# Altium PCB PCB_HDMI_To_FPC-v1.0.PcbDoc (part 2 of 3)
Units mil, origin at the board's own origin, x right, y up, seen from the top; angles counter-clockwise.
Board outline 2043 x 1400 mil, 2 copper layers (Top Layer, Bottom Layer), stack 61.811 mil thick; 121 components, 92 nets, 483 pads, 226 vias.
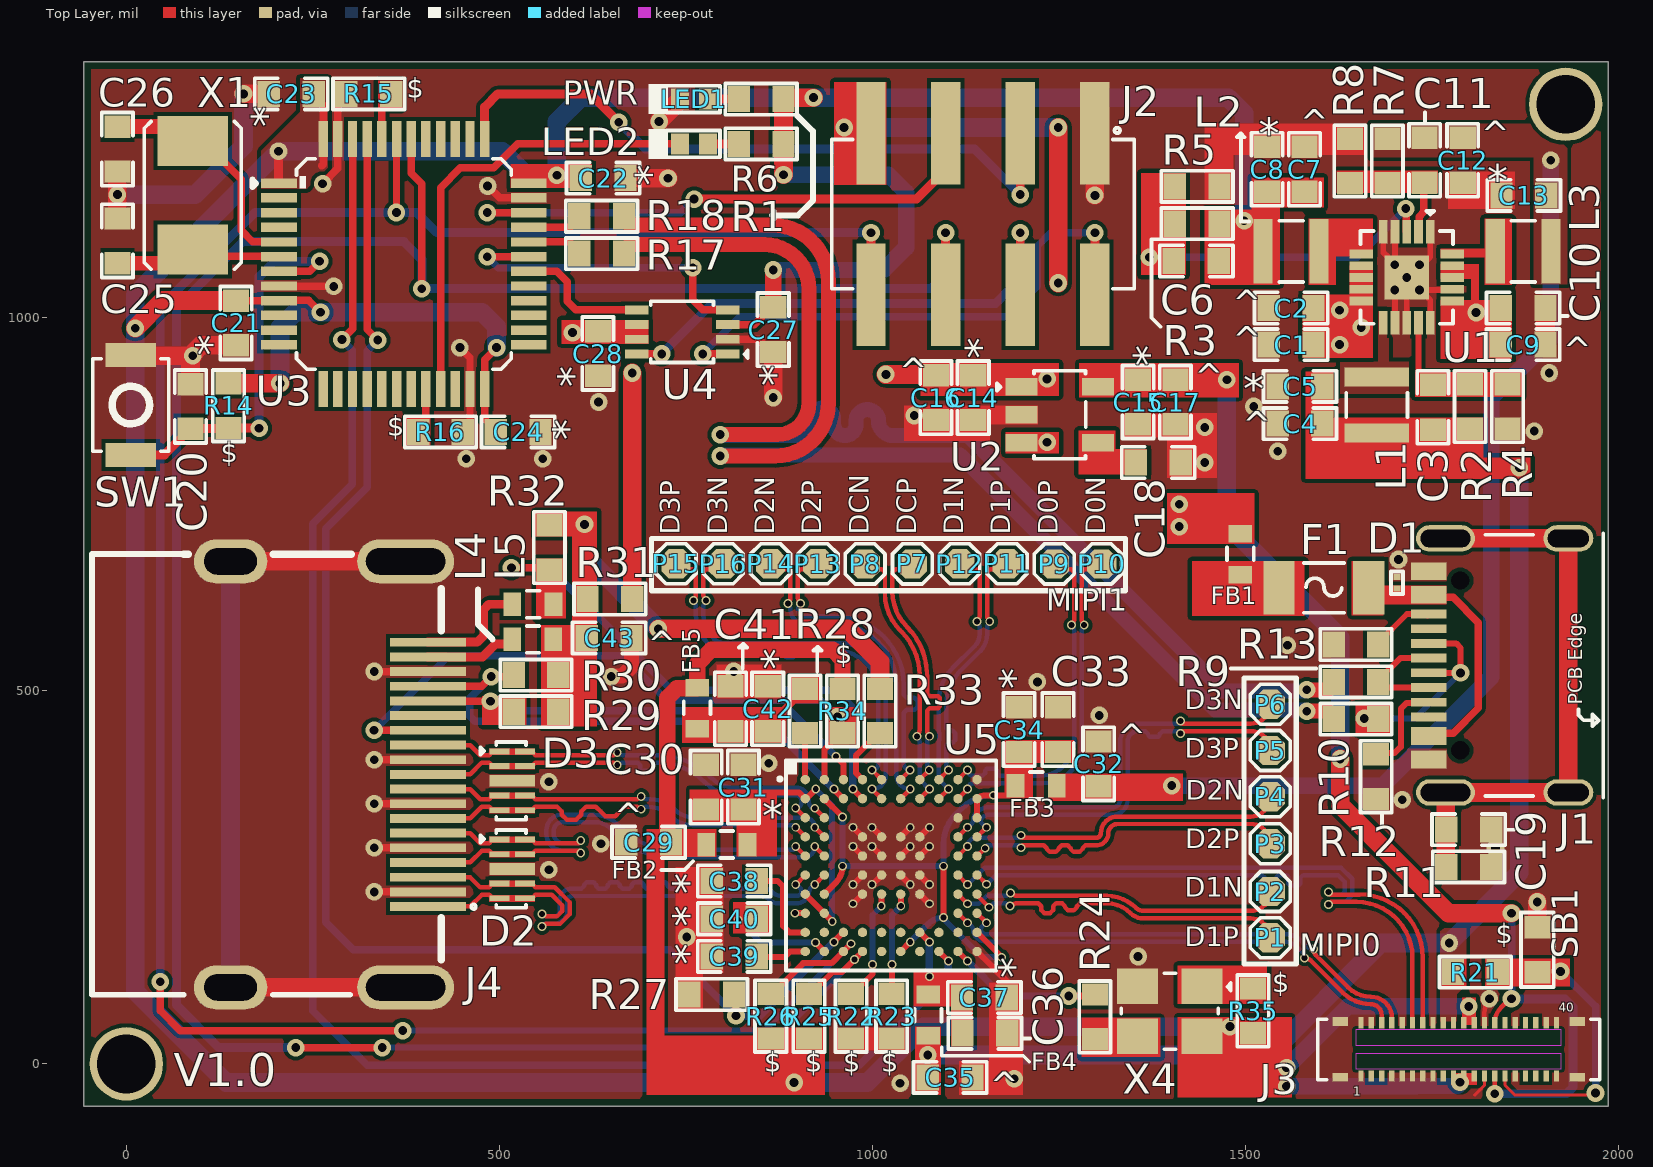
[diagram p0: Top Layer view]

## Part data (continued)
SW1: "SWITCH TACTILE SPST-NO 0.05A 12V", Contact Current Rating=50mA, Contact Resistance=100mR, Insulation Resistance=100MR, LCSC Part Number=C231329, Manufacturer=Omron, Max Operating Temperature=70°C, Max Voltage Rating (DC)=12V, Min Operating Temperature=-25°C, Operating Force=1.5N, Package Quantity=1, Ratings="Dust Proof,IP40", Supplier Part Number 1=SW1020DKR-ND, Actuator Length=0.4mm, Actuator Type=Standard, ComponentLink1Description=http://www.farnell.com/datasheets/60838.pdf?src-supplier=Farnell, ComponentLink1URL=http://www.farnell.com/datasheets/60838.pdf?src-supplier=Farnell, ComponentLink2Description=http://www.farnell.com/datasheets/60838.pdf?src-supplier=Element14, ComponentLink2URL=http://www.farnell.com/datasheets/60838.pdf?src-supplier=Element14, ComponentLink3Description=https://omronfs.omron.com/en_US/ecb/products/pdf/en-b3u.pdf?src-supplier=Digi-Key, ComponentLink3URL=https://omronfs.omron.com/en_US/ecb/products/pdf/en-b3u.pdf?src-supplier=Digi-Key, ComponentLink4Description=http://www.omron.com/ecb/products/pdf/en-b3u.pdf?src-supplier=Digi-Key, ComponentLink4URL=http://www.omron.com/ecb/products/pdf/en-b3u.pdf?src-supplier=Digi-Key, ComponentLink5Description=https://www.distrelec.biz/Web/Downloads/he/et/B3U_eng_datasheet.pdf?mime=application%2Fpdf&src-supplier=Distrelec, ComponentLink5URL=https://www.distrelec.biz/Web/Downloads/he/et/B3U_eng_datasheet.pdf?mime=application%2Fpdf&src-supplier=Distrelec, ComponentLink6Description=http://www.onlinecomponents.com/productFiles/mf-OM/en-b3u.pdf?src-supplier=Onlinecomponents.com, ComponentLink6URL=http://www.onlinecomponents.com/productFiles/mf-OM/en-b3u.pdf?src-supplier=Onlinecomponents.com, ComponentLink7Description=https://www.verical.com/server-webapp/html/getDatasheet?partID=552554&src-supplier=Verical, ComponentLink7URL=https://www.verical.com/server-webapp/html/getDatasheet?partID=552554&src-supplier=Verical, ComponentLink8Description=http://www.farnell.com/datasheets/1685550.pdf?src-supplier=Element14, ComponentLink8URL=http://www.farnell.com/datasheets/1685550.pdf?src-supplier=Element14, ComponentLink9Description=http://www.farnell.com/datasheets/2610940.pdf?src-supplier=Farnell, ComponentLink9URL=http://www.farnell.com/datasheets/2610940.pdf?src-supplier=Farnell, ComponentLink10Description=https://www.alliedelec.com/m/d/4c8a9ef82804fc3c241a13c1e298fd73.pdf?src-supplier=Allied+Electronics, ComponentLink10URL=https://www.alliedelec.com/m/d/4c8a9ef82804fc3c241a13c1e298fd73.pdf?src-supplier=Allied+Electronics, Contact Material=Silver, Current Rating=50mA, Depth=2.5mm, Electrical Life=200000Cycles, Height=1.2mm, Illumination Type=Non-Illuminated,Illuminated, Item Type=Switch, Lead Free="Lead Free", Length=4mm, Manufacturer Part Number=B3U-1000P, Max Current Rating=50mA, Mechanical Life=200000Cycles, Mount="Surface Mount", Orientation=Straight, Packaging="Tape and Reel", Pricing 1="1=1, 10=0.961, 25=0.9064, 50=0.7976, 100=0.7251, 250=0.68888, 500=0.67074, 1000=0.52571 (USD)", REACH SVHC=Unknown, Stock 1=116454, Supplier 1=Digi-Key, Switch Function=Off-Mom, Switch Travel=0.15mm, Termination=SMD/SMT, Throw Configuration=SPST, Voltage Rating (DC)=12V, Weight=0.000776oz, Width=3mm
U1: "2.7V~5.5V 3 WQFN-20-EP(3x3) Battery Management ICs ROHS", LCSC Part Number=C570857, Manufacturer="Everanalog IC Design", Package=WQFN-20-EP(3x3), ComponentLink1Description=LCSC, ComponentLink1URL=https://www.lcsc.com/product-detail/Battery-Management-ICs_Everanalog-IC-design-EA3036CQBR_C570857.html, Item Type=IC, Manufacturer Part Number=EA3036CQBR
U2: "IC REG LDO 2.8V 0.3A SOT23-5", Case/Package=SOT-23-5, Dropout Voltage=220mV, LCSC Part Number=C56731, Manufacturer=Richtek, Max Operating Temperature=125°C, Max Output current=300mA, Max Supply Voltage=5.5V, Min Current Limit=360mA, Min Input Voltage=2.5V, Min Operating Temperature=-40°C, Nominal Output Voltage=2.8V, Supplier Part Number=1028-1072-1-ND, Category="Voltage Regulators - Linear", ComponentLink1Description=https://datasheet.ciiva.com/22686/1720535-22686400.pdf?src-supplier=Element14, ComponentLink1URL=https://datasheet.ciiva.com/22686/1720535-22686400.pdf?src-supplier=Element14, ComponentLink2Description=https://datasheet.ciiva.com/24157/rt9193-28gb-24157638.pdf?src-supplier=Future+Electronics, ComponentLink2URL=https://datasheet.ciiva.com/24157/rt9193-28gb-24157638.pdf?src-supplier=Future+Electronics, Item Type=IC, Lead Free="Lead Free", Manufacturer Part Number=RT9193-28GB, Mounting Technology="Surface Mount", Number of Regulators=1, Output Current=300mA, Output Voltage=2.8V, Packaging="Cut Tape", Pins=5, Pricing="1=0.53, 10=0.454, 25=0.424, 100=0.3394, 250=0.31512, 500=0.26664, 1000=0.20604 (USD)", Reach SVHC Compliant=Unknown, RoHS=Yes, RoHS Compliant=Yes, Series=-, Stock=1346, Supplier=Digikey
U3: "IC MCU 32BIT 128KB FLASH 48LQFP", Case/Package=LQFP, Clock Frequency=72MHz, LCSC Part Number=C8304, Manufacturer=STMicroelectronics, Max Operating Temperature=85°C, Max Power Dissipation=363mW, Max Supply Voltage=3.6V, Min Operating Temperature=-40°C, Min Supply Voltage=2V, Package Quantity=250, Supplier Part Number=511-STM32F103CBT6, Address Bus Width=32b, Category=Microcontrollers, ComponentLink1Description=https://datasheet.ciiva.com/23669/1714663-23669200.pdf?src-supplier=Newark, ComponentLink1URL=https://datasheet.ciiva.com/23669/1714663-23669200.pdf?src-supplier=Newark, ComponentLink2Description=https://datasheet.ciiva.com/15122/getdatasheetpartid-92132-15122195.pdf?src-supplier=Verical, ComponentLink2URL=https://datasheet.ciiva.com/15122/getdatasheetpartid-92132-15122195.pdf?src-supplier=Verical, ComponentLink3Description=https://datasheet.ciiva.com/5752/cd00161566-5752838.pdf?src-supplier=Farnell, ComponentLink3URL=https://datasheet.ciiva.com/5752/cd00161566-5752838.pdf?src-supplier=Farnell, ComponentLink4Description=https://datasheet.ciiva.com/14100/pustm-arm-microcont-stm32f103-en-14100509.pdf?src-supplier=Distrelec, ComponentLink4URL=https://datasheet.ciiva.com/14100/pustm-arm-microcont-stm32f103-en-14100509.pdf?src-supplier=Distrelec, ComponentLink5Description=https://datasheet.ciiva.com/1502/cd00161566-1502328.pdf?src-supplier=Digi-Key, ComponentLink5URL=https://datasheet.ciiva.com/1502/cd00161566-1502328.pdf?src-supplier=Digi-Key, ComponentLink6Description=https://datasheet.ciiva.com/4840/cd00161566-4840398.pdf?src-supplier=Mouser, ComponentLink6URL=https://datasheet.ciiva.com/4840/cd00161566-4840398.pdf?src-supplier=Mouser, ComponentLink7Description=https://datasheet.ciiva.com/16219/cd00161566-16219150.pdf?src-supplier=Future+Electronics, ComponentLink7URL=https://datasheet.ciiva.com/16219/cd00161566-16219150.pdf?src-supplier=Future+Electronics, Core Architecture=ARM, Data Bus Width=32b, Density=128KB, Frequency=72MHz, Height=1.45mm, Interface=I2C,SPI,USB,CAN,IrDA,UART,USART,LIN, Item Type=IC, Lead Free="Lead Free", Length=7mm, Manufacturer Part Number=STM32F103CBT6, Memory Format=FLASH, Memory Size=128KB, Number of ADC Channels=10, Number of Bits=32, Number of I2C Channels=2, Number of I/Os=37, Number of Programmable I/O=37, Number of PWM Channels=12, Number of SPI Channels=2, Number of Timers/Counters=4, Oscillator Type=Internal, Packaging=Tray, Peripherals="POR,PWM,WDT,DMA,Temp Sensor,I2C", Pins=48, Pricing="1=7.35, 10=6.65, 50=5.53, 100=5.49, 1000=4.31, 10000=4.25 (USD)", Radiation Hardening=No, RAM Size=20KB, Reach SVHC Compliant=No, RoHS=Yes, RoHS Compliant=Yes, Series="STM32 F1", Stock=3552, Supplier=Mouser, Termination=SMD/SMT, Watchdog Timer=Yes, Width=7.2mm
U4: "IC TRANSLTR BIDIRECTIONAL 8VSSOP", Case/Package=VSSOP, High Level Output Current=-20uA, LCSC Part Number=C60709, Low Level Output Current=20uA, Manufacturer="Texas Instruments", Max Operating Temperature=85°C, Max Supply Voltage=5.5V, Min Operating Temperature=-40°C, Min Supply Voltage=1.2V, Nominal Supply Current=3.5uA, Package Quantity=3000, Supplier Part Number=296-22862-1-ND, Category="Voltage Level Shifters", Channel Type=Bidirectional, ComponentLink1Description=https://datasheet.ciiva.com/7744/1634161-7744195.pdf?src-supplier=Element14, ComponentLink1URL=https://datasheet.ciiva.com/7744/1634161-7744195.pdf?src-supplier=Element14, ComponentLink2Description=https://datasheet.ciiva.com/22677/1699360-22677930.pdf?src-supplier=Element14, ComponentLink2URL=https://datasheet.ciiva.com/22677/1699360-22677930.pdf?src-supplier=Element14, ComponentLink3Description=https://datasheet.ciiva.com/4226/sces641b-4226960.pdf?src-supplier=Arrow+Electronics, ComponentLink3URL=https://datasheet.ciiva.com/4226/sces641b-4226960.pdf?src-supplier=Arrow+Electronics, ComponentLink4Description=https://datasheet.ciiva.com/15096/getdatasheetpartid-214907-15096235.pdf?src-supplier=Verical, ComponentLink4URL=https://datasheet.ciiva.com/15096/getdatasheetpartid-214907-15096235.pdf?src-supplier=Verical, ComponentLink5Description=https://datasheet.ciiva.com/6132/txb0102-6132717.pdf?src-supplier=Farnell, ComponentLink5URL=https://datasheet.ciiva.com/6132/txb0102-6132717.pdf?src-supplier=Farnell, ComponentLink6Description=https://datasheet.ciiva.com/46384/1874809-46384198.pdf?src-supplier=Element14, ComponentLink6URL=https://datasheet.ciiva.com/46384/1874809-46384198.pdf?src-supplier=Element14, ComponentLink7Description=https://datasheet.ciiva.com/1899/txb0102-1899430.pdf?src-supplier=Digikey, ComponentLink7URL=https://datasheet.ciiva.com/1899/txb0102-1899430.pdf?src-supplier=Digikey, ComponentLink8Description=https://datasheet.ciiva.com/1899/txb0102-1899429.pdf?src-supplier=Digikey, ComponentLink8URL=https://datasheet.ciiva.com/1899/txb0102-1899429.pdf?src-supplier=Digikey, ComponentLink9Description=https://datasheet.ciiva.com/1899/txb0102-1899431.pdf?src-supplier=Digikey, ComponentLink9URL=https://datasheet.ciiva.com/1899/txb0102-1899431.pdf?src-supplier=Digikey, ComponentLink10Description=https://datasheet.ciiva.com/14287/txb0102-14287496.pdf?src-supplier=Avnet, ComponentLink10URL=https://datasheet.ciiva.com/14287/txb0102-14287496.pdf?src-supplier=Avnet, ComponentLink11Description=LCSC, ComponentLink11URL=https://www.lcsc.com/product-detail/Translators-Level-Shifters_Texas-Instruments-TXB0102DCUR_C60709.html, Data Rate=100Mbps, Height=900um, Lead Free="Lead Free", Length=2.3mm, Logic Function=Translator, Manufacturer Part Number=TXB0102DCUR, Mounting Technology="Surface Mount", Number of Bits=2, Number of Circuits=1, Number of Inputs=1NUMBER, Number of Outputs=1NUMBER, Output Type=3-STATE, Packaging="Tape and Reel", Pins=8, Pricing="1=0.69, 10=0.606, 25=0.5696, 100=0.4649, 250=0.4318, 500=0.36748, 1000=0.29398 (USD)", Propagation Delay=7.4ns, Radiation Hardening=No, Reach SVHC Compliant=No, RoHS=Yes, RoHS Compliant=Yes, Series=-, Stock=10593, Supplier=Digikey, Thickness=850um, Turn-On Delay Time=31ns, Type=IC, Weight=0.000339oz, Width=2mm
U5: "Ultra HD to Display Serial Interface Converter 80-Pin VFBGA", Case/Package=VFBGA, LCSC Part Number=C3008712, Manufacturer=Toshiba, Max Operating Temperature=70°C, Min Operating Temperature=-30°C, Supplier Part Number=757-TC358870XBG(NOK), ComponentLink1Description=LCSC, ComponentLink2Description=http://toshiba.semicon-storage.com/info/docget.jsp?did=28743&prodName=TC358870XBG&src-supplier=Avnet, ComponentLink2URL=http://toshiba.semicon-storage.com/info/docget.jsp?did=28743&prodName=TC358870XBG&src-supplier=Avnet, Item Type=IC, Manufacturer Part Number=TC358870XBG(NOK), Manufaure Part Number=TC358870XBG(NOK), Pricing="1=10.6, 10=9.75, 50=9.35, 100=8.24, 1000=7.32, 10000=6.71 (USD)", RoHS=Yes, Stock=662, Supplier=Mouser
X1: library part X50328MSB2GI, "8MHz 20pF ±10ppm ±50ppm SMD5032-2P Crystals ROHS", LCSC Part Number=C115962, Manufacturer="Yangxing Tech", Package=SMD5032-2P, ComponentLink1Description=LCSC, ComponentLink1URL=https://www.lcsc.com/product-detail/Crystals_Yangxing-Tech-X50328MSB2GI_C115962.html, Item Type=Crystal, Manufacturer Part Number=X50328MSB2GI
X4: library part O3240000153350, "3.3V 5mA ±25ppm 40MHz CMOS SMD3225-4P Oscillators ROHS", LCSC Part Number=C437132, Manufacturer=JGHC, ComponentLink1Description=LCSC, ComponentLink1URL=https://www.lcsc.com/product-detail/Oscillators_JGHC-O3240000153350_C437132.html, Item Type=Crystal, Manufacturer Part Number=O3240000153350

## Free pads (board coordinates)
  round 98.43 hole 78.74 unplated mask+1.97: MH(0,0) MH(1929,1286)

## Via types
v1: diameter 23.62, hole 11.81, Top Layer to Bottom Layer, tented both sides, 130 vias
v2: diameter 11.81, hole 7.87, Top Layer to Bottom Layer, tented both sides, 96 vias

## Nets (pads, with @x,y where several pads share a name; then routed paths per layer and width w, separated by ;. In a path a pad name is that pad's centre, name@x,y a point inside that pad or via, vN(x,y) a via of type N, cw(c..) or ccw(c..) an arc to the next point about the centre after c; other vN are vias at no path point)
1V1: C11.2 C12.2 C13.2 C32.2 FB3.2 L3.2 R7.2 | length 1213.8
  Bottom Layer w22: v1@1401.44,373 1684,373 1829,518 1829,892 1909,972 v1(1909,1211)
  other v1: 1401,373
1V8: C3.2 C4.2 C5.2 C35.2 FB4.2 J3.18 J3.20 L1.2 R2.2 R21.1 | length 1437.1
  Bottom Layer w25: v1(1074,12) 1532,12 1682,162 v1(1773,162) 1867,256 v1(1867,799)
2V8: C15.2 C17.2 J3.27 J3.28 U2.5 | length 1413.6
  Top Layer w4: v1@1855.88,88.88 1855.88,87.19 v1(1856.43,87.19) 1859.71,90.47 cw(c1861,89.17) v1@1861,91
  Top Layer w6: J3.27@1833.89,-16.43 1834,-20.91 v1(1834,-40) ; J3.28@1833.89,55.23 cw(c1862.04,55.23) 1842.14,75.14 v1@1855.88,88.88
  Top Layer w25: v1(1627,408.65) 1627,347 1772,202 v1(1856.43,202)
  Bottom Layer w10: v1(1856.43,87.19) v1(1856.43,202)
  Bottom Layer w12: v1(1834,-40) 1930,-40 1939,-31 1939,76 1927.81,87.19 v1(1856.43,87.19)
  Bottom Layer w25: v1(1475,917) 1475,723 1627,571 v1(1627,408.65)
3V3: C6.2 C7.2 C8.2 C21.2 C22.2 C23.2 C24.2 C27.1 C29.2 FB2.2 FB5.2 J3.19 J3.21 J3.22 J3.23 J3.24 L2.2 R1.1 R3.2 R6.1 R14.1 R25.1 R26.1 R34.1 R35.1 U3.1 U3.9 U3.24 U3.36 U3.48 U4.3 X4.4 | length 7260.4
  Top Layer w10: C21.2@147,1023 147.21,1022.79 U3.9@204.68,1022.79 205.17,1023.28 244.19,1023.28 v1@260.12,1007.35 ; C23.2@251,1300 251,1297.5 263.73,1284.77 U3.48@263.73,1239.32 263.73,1205.34 261.88,1203.48 ; C24.2@495,847 495,849.5 480.27,864.23 U3.24@480.27,904.68 480.27,943.69 v1@496.2,959.63 ; U3.36@539.32,1180.27 602.27,1180.27 C22.2@609,1187 ; U4.3@806.02,990.84 841.34,990.84 864.5,1014 C27.1@867,1014
  Top Layer w12: U3.1@204,1180.94 v1(204,1223)
  Top Layer w22: 709,170 709,296 710,297 C29.2@725,297 ; C29.2@726,297 C29.2@725,297 ; C27.1@867,1014 v1(867,1064) ; R34.1@959.82,503 959.82,542.11 946.93,555 784,555 765,536 FB5.2@765,504.12 764.19,503.31 737.89,503.31 725,490.42 C29.2@725,297
  Top Layer w25: v1(12,986) 49,1023 C21.2@147,1023 ; R14.1@137,912 v1(206,912) ; v1(880.7,1191.5) R6.1@880.7,1233 R1.1@880.7,1293 ; R1.1@880.7,1295 v1(921,1295)
  Bottom Layer w22: v1(867,1064) 1015,1064 1045,1094 1045,1168 1021.5,1191.5 v1(880.7,1191.5) ; v1(1555.02,-30) 1728.55,-30 1728.97,-29.58 v1@1784.36,-29.58 ; v1(1555.02,-5.02) 1637.04,77 v1(1799,77)
  Bottom Layer w25: v1(206,912) 206,987 226.35,1007.35 v1(260.31,1007.35) 476.64,1007.35 496.2,987.79 v1(496.2,960) ; v1(1479,50) 1068,50 993,-25 v1(895,-25) 134,-25 12,97 v1(12,986) 12,1031 v1(204,1223) 504,1223 536,1191 v1(577,1191) 577,1263 609,1295 v1(921,1295) 1477,1295 1498,1274 v1(1498,1130)
  other v1: 1787.36,-24.58
B_REFCLK: R24.1 U5.K9 | length 208.7
  Top Layer w8: U5.K9@1114.59,150.69 v2(1127.39,137.89)
  Top Layer w10: v1(1263,91) 1293.17,91 ccw(c1293.17,97.83) R24.1@1298,93
  Bottom Layer w10: v2(1127.39,137.89) 1174.28,91 v1(1263,91)
B_RESX: U3.46 U5.K8 | length 2171.7
  Top Layer w8: U5.K8@1089,150.69 v2(1101.8,137.89)
  Top Layer w10: v1@288.89,970.65 303.36,985.12 U3.46@303.36,1239.07
  Bottom Layer w10: v1(288.89,970.65) 303,956.54 303,777 250,724 250,71 323,-2 982,-2 1101.8,117.8 v2(1101.8,137.89)
BOOT_0: R16.1 U3.20 | length 57.7
  Top Layer w10: R16.1@401.53,847 U3.20@401.53,904.68
BOOT_1: R15.2 U3.44 | length 66.3
  Top Layer w10: U3.44@342.47,1239.32 342.47,1283.97 356,1297.5 R15.2@356,1300
CEC: J4.13 R34.2 U5.A2 | length 842.1
  Top Layer w8: U5.A2@935.46,381 935.46,421.14 946.32,432 957.32,443 R34.2@959.82,443
  Top Layer w10: v1(332.07,447.07) J4.13@404.3,447.07
  Bottom Layer w10: v1(332.07,447.07) 432,547 665,547 725,487 931,487 v1(953,465)
D_SWCLK: J2.3 U3.37 | length 949.8
  Top Layer w10: U3.37@480,1239.59 480,1283
  Top Layer w12: U3.37@480.13,1239.46 U3.37@480.27,1239.32 480.27,1282.27 498,1300 622,1300 v1(660,1262) ; v1(1198,1165) J2.3@1198,1247.27
  Bottom Layer w12: v1(660,1262) 696,1226 1137,1226 v1(1198,1165)
D_SWDIO: J2.5 U3.34 | length 742.7
  Top Layer w10: v1(483.76,1140.9) U3.34@539.32,1140.9
  Top Layer w12: v1(761,1159) 1058.94,1159 1098,1198.06 J2.5@1098,1247.27
  Bottom Layer w10: v1(483.76,1140.9) 742.9,1140.9 v1(761,1159)
GND: C1.1 C2.1 C4.1 C5.1 C7.1 C8.1 C9.1 C10.1 C12.1 C13.1 C14.2 C15.1 C16.2 C17.1 C18.1 C19.1 C20.2 C21.1 C22.1 C23.1 C24.1 C25.1 C26.1 C27.2 C28.2 C29.1 C30.1 C31.1 C32.1 C33.1 C34.1 C35.1 C36.1 C37.1 C38.1 C39.1 C40.1 C41.1 C42.1 C43.1 D1.2 D2.3_8 D3.3_8 J1.A1/B12 J1.B1/A12 J2.1 J3.1 J3.2 J3.4 J3.7 J3.9 J3.10 J3.11 J3.13 J3.15 J3.16 J3.25 J3.26 J3.31 J3.32 J3.38 J3.39 J3.40 J3.S1 J3.S2 J3.S3 J3.S4 J4.2 J4.5 J4.8 J4.11 J4.17 J4.S1 J4.S2 J4.S3 J4.S4 LED1.2 R4.1 R5.1 R8.1 R11.1 R12.2 R13.2 R15.1 R16.2 R22.1 R23.1 R27.2 SB1.1 SW1.2 U1.1 U1.4 U1.5 U1.12 U1.13 U1.15 U1.17 U1.21 U2.2 U3.8 U3.23 U3.35 U3.47 U4.2 U5.A10 U5.C9 U5.D4 U5.D5 U5.D6 U5.D7 U5.E4 U5.E5 U5.E6 U5.E7 U5.F4 U5.F5 U5.F6 U5.F7 U5.G4 U5.G7 U5.H1 U5.K10 X4.2 | length 3589.8
  Top Layer w4: 1806.91,-41.91 1820.11,-28.7 J3.25@1820.11,-16.43
  Top Layer w6: J3.26@1820.11,55.23 1820.11,68.6 cw(c1846.4,68.6) 1824.44,83.05 cw(c1846.4,68.6) v1@1827.81,87.19
  Top Layer w8: v2(896,202) 896.07,201.93 909.8,201.93 U5.H1@909.87,201.87 ; v2(973.84,214.66) U5.G4@986.64,227.46 ; v2(973.84,240.25) U5.F4@986.64,253.05 ; v2(973.84,291.43) U5.E4@986.64,278.64 ; v2(973.84,317.03) U5.D4@986.64,304.23 ; v2(999.43,240.25) U5.F5@1012.23,253.05 ; v2(999.43,291.43) U5.E5@1012.23,278.64 ; v2(999.43,317.03) U5.D5@1012.23,304.23 ; U5.F6@1037.82,253.05 v2(1050.61,240.25) ; U5.E6@1037.82,278.64 v2(1050.61,291.43) ; U5.D6@1037.82,304.23 v2(1050.61,317.03) ; U5.G7@1063.41,227.46 v2(1076.21,214.66) ; U5.F7@1063.41,253.05 v2(1076.21,240.25) ; U5.E7@1063.41,278.64 v2(1076.21,291.43) ; U5.D7@1063.41,304.23 v2(1076.21,317.03) ; U5.K10@1140.18,150.69 1180,110.87 C37.1@1180,89 ; C17.1@1406,857 v1@1448,857 ; U1.5@1684.5,1115.02 1684.5,1087.5 1690.47,1081.53 1690.47,1079.53 1694,1076 1696,1076 U1.21@1696,1071 ; U1.12@1700,993.23 U1.21@1700,1031 ; U1.4@1700.25,1115.02 1700.25,1064.75 U1.21@1705,1060 ; U1.13@1716,992.98 v1(1716,1054) ; U1.21@1730,1038 1730.75,1037.25 v1(1733,1037.25) U1.17@1780.02,1037.25 ; U1.21@1739,1031 1741.53,1028.47 1742.81,1028.47 1747.5,1023.79 U1.15@1747.5,992.98 ; U1.21@1742,1077 1742.81,1077 1747.5,1081.69 U1.1@1747.5,1115.02
  Top Layer w10: U3.8@204.68,1042.47 204.91,1042.24 277.76,1042.24 v1(278,1042) ; v1(263,1179.67) 283.42,1200.09 U3.47@283.42,1239.32 283.42,1285.92 295,1297.5 R15.1@295,1300 ; R15.1@296,1290.5 R15.1@296,1293 ; v1(332.18,230.49) J4.2@404.3,230.49 ; v1(332.18,289.56) J4.5@404.3,289.56 ; v1(332.18,348.62) J4.8@404.3,348.62 ; v1(332.18,407.69) J4.11@404.3,407.69 ; v1(332.18,525.82) J4.17@404.3,525.82 ; v1(447,960) 460.58,946.42 U3.23@460.58,904.68 R16.2@460.58,848.42 ; v1(484.19,1176.52) 484.37,1176.52 500.31,1160.58 U3.35@539.32,1160.58 ; U4.2@806.02,971.16 847.34,971.16 864.5,954 C27.2@867,954
  Top Layer w20: v1(650,519) 650.69,519.69 664.3,519.69 677,532.39 C43.1@677,571
  Top Layer w25: C25.1@-12,1134 v1(-12,1165) C26.1@-12,1196 C26.1@-12,1197 ; SW1.2@6.93,949 v1@86,949 ; C20.2@86,911 v1@86,949 ; v1(89.12,949) v1@87.56,950.56 ; J4.S3@139.7,102.54 J4.S2@374.36,102.54 ; J4.S4@139.7,673.46 J4.S1@374.36,673.46 ; C21.1@147,963 100,963 v1@87.56,950.56 ; v1(157,1300) C23.1@191,1300 ; C22.1@669,1187 v1(726,1187) ; v1(714,1263) 714,1263.62 LED1.2@741.7,1291.33 ; v1@867,894 C27.2@867,954 ; v1(1298,1164) J2.1@1298,1247.27 ; SB1.1@1891,185.5 v1(1891,217) ; C9.1@1902,964 C10.1@1902,1013 ; v1@86,949 v1@87.56,950.56
  Bottom Layer w25: v1(-12,1165) 92,1165 157,1230 v1(157,1300) ; J4.S3@139.7,102.54 J4.S4@139.7,673.46
  other v1: 1037,-26 1190,-20 1826.81,87.19 1356,144 751,170 566.31,260.31 1835,289 636,295 1710,354 566.31,378 861,403 1304,467 1221,512 814,526 1556,561 1705,676 1445.19,806 455.59,811 558,811 1543,821 1887,848 1445.19,853 1056,869 1511,881 633,887 867,893 1907,926 1700,1037.25 1700,1071 1733,1071
HDMIC_N: D3.1 D3.10 J4.12 U5.C2 | length 542.9
  Top Layer w6: J4.12@404.3,427.38 404.65,427.03 460.97,427.03 474.16,413.84 486.2,413.84 489.71,417.36 489.71,417.75 490.65,418.68 D3.1@500,418.68 ; D3.10@534.45,418.68 543.8,418.68 544.74,417.75 544.74,417.36 548.25,413.84 653.02,413.84 656.43,417.25 v2(658,417.25) ; v2(922.66,342.62) U5.C2@935.46,329.82
  Bottom Layer w6: v2(658,417.25) cw(c658,413.45) 660.68,416.14 ccw(c666.22,421.67) 666.22,413.84 711.13,413.84 cw(c711.13,312.39) 782.87,384.13 783,384 ccw(c816.8,417.8) 816.8,370 897.87,370 cw(c897.87,353) 914.87,353 914.87,350.41 ccw(c922.66,350.41) v2(922.66,342.62)
HDMIC_P: D3.2 D3.9 J4.10 U5.C1 | length 542.9
  Top Layer w6: J4.10@404.3,388 404.63,388.32 460.97,388.32 476.49,403.84 486.2,403.84 489.71,400.33 489.71,399.94 490.65,399 D3.2@500,399 ; D3.9@534.45,399 543.8,399 544.74,399.94 544.74,400.33 548.25,403.84 653.02,403.84 656.43,400.44 v2(658,400.44) ; v2@896.85,342.62 v2(897.07,342.84) ; v2@897.07,342.62 U5.C1@909.87,329.82
  Bottom Layer w6: v2(658,400.44) ccw(c658,404.23) 660.68,401.55 cw(c666.22,396.01) 666.22,403.84 685.22,403.84 688.74,400.33 688.74,395.44 691.14,393.04 702.34,393.04 704.74,395.44 704.74,400.33 708.25,403.84 710.95,403.84 717,403.64 cw(c710.95,311.95) 720,403.4 cw(c710.95,311.95) 775.93,376.93 ; 775.96,376.89 ccw(c816.75,417.68) 816.75,360 897.87,360 cw(c897.87,353) 904.87,353 904.87,350.63 cw(c897.07,350.63) v2(897.07,342.84)
HDMID0_N: D3.4 D3.7 J4.9 U5.D2 | length 527.9
  Top Layer w6: J4.9@404.65,367.96 460.97,367.96 474.14,354.79 486.2,354.79 489.71,358.3 489.71,358.69 490.65,359.63 D3.4@500,359.63 ; D3.7@534.45,359.63 543.8,359.63 544.74,358.69 544.74,358.3 548.25,354.79 685.02,354.79 688.43,358.19 v2(690,358.19) ; v2(922.66,317.03) U5.D2@935.46,304.23
  Bottom Layer w6: v2(690,358.19) cw(c690,354.4) 692.68,357.08 ccw(c698.22,362.62) 698.22,354.79 702.64,354.79 cw(c702.64,310.77) 733.77,341.89 ccw(c762.49,370.61) 762.49,330 895.73,330 ccw(c897.07,342.84) 897.07,329.93 ccw(c897.07,342.84) 898.41,330 909.69,330 cw(c909.69,317.03) v2(922.66,317.03)
HDMID0_P: D3.5 D3.6 J4.7 U5.D1 | length 527.9
  Top Layer w6: J4.7@404.63,329.25 460.97,329.25 476.5,344.79 486.2,344.79 489.71,341.27 489.71,340.88 490.65,339.94 D3.5@500,339.94 ; D3.6@534.45,339.94 543.8,339.94 544.74,340.88 544.74,341.27 548.17,344.71 548.25,344.79 577.17,344.79 583.67,338.29 583.67,333.91 590.17,327.41 603.17,327.41 609.67,333.91 609.67,338.29 616.17,344.79 629.17,344.79 635.67,338.29 642.17,331.79 655.17,331.79 661.67,338.29 668.17,344.79 684.38,344.79 685.02,344.79 688.43,341.38 v2(690,341.38) ; v2(897.07,317.03) U5.D1@909.87,304.23
  Bottom Layer w6: v2(690,341.38) ccw(c690,345.18) 692.68,342.49 cw(c698.22,336.96) 698.22,344.79 698.5,344.79 cw(c698.5,300.77) 729.63,331.89 ccw(c758.34,360.61) 758.34,320 894.1,320 cw(c894.1,317.03) v2(897.07,317.03)
HDMID1_N: D2.1 D2.10 J4.6 U5.E2 | length 627.6
  Top Layer w6: J4.6@404.65,308.9 460.97,308.9 474.03,295.84 486.2,295.84 489.71,299.36 489.71,299.75 490.65,300.68 D2.1@500,300.68 ; D2.10@534.45,300.68 543.8,300.68 544.74,299.75 544.74,299.36 548.25,295.84 605.59,295.84 ccw(c605.59,299.25) v2(609,299.25) ; v2(922.66,291.43) U5.E2@935.46,278.64
  Bottom Layer w6: v2(609,299.25) cw(c605.59,299.25) 605.59,295.84 585.16,295.84 cw(c585.16,308) 573,308 573,313 cw(c584,313) 584,324 626.86,324 cw(c626.86,289.86) 651,314 659.11,305.89 ccw(c728.86,375.64) 728.86,277 908.23,277 ccw(c908.23,291.43) v2(922.66,291.43)
HDMID1_P: D2.2 D2.9 J4.4 U5.E1 | length 628.4
  Top Layer w6: J4.4@404.63,270.19 460.97,270.19 476.62,285.84 486.2,285.84 489.71,282.33 489.71,281.94 490.65,281 D2.2@500,281 ; D2.9@534.45,281 543.8,281 544.74,281.94 544.74,282.33 548.25,285.84 605.59,285.84 cw(c605.59,282.44) v2(609,282.44) ; v2(897.07,291.43) U5.E1@909.87,278.64
  Bottom Layer w6: v2(609,282.44) ccw(c605.59,282.44) 605.59,285.84 585.16,285.84 cw(c585.16,308) 563,308 563,313 cw(c584,313) 584,334 626.92,334 cw(c626.92,290) 658.03,321.11 663.25,315.89 ccw(c733,385.64) 733,287 892.64,287 ccw(c892.64,291.43) v2(897.07,291.43)
HDMID2_N: D2.4 D2.7 J4.3 U5.F2 | length 662.5
  Top Layer w6: J4.3@404.65,249.83 460.97,249.83 474.01,236.79 486.2,236.79 489.71,240.3 489.71,240.69 490.65,241.63 D2.4@500,241.63 ; D2.7@534.45,241.63 543.32,241.63 548.34,236.6 556,236.6 556.18,236.79 574.14,236.79 594,216.93 594,200.37 581.22,187.59 561.98,187.59 558.57,184.19 v2(557,184.19) ; v2(922.66,240.25) U5.F2@935.46,253.05
  Bottom Layer w6: v2(557,184.19) cw(c560.41,184.19) 560.41,187.59 573,187.59 ccw(c573,205.59) 591,205.59 591,219 cw(c597,219) 592.76,223.24 cw(c597,219) 597,225 849.88,225 cw(c849.88,208.52) 861.53,220.17 ccw(c873.19,231.83) 873.19,215.35 898.92,215.35 ccw(c898.92,231.21) 910.14,219.99 911.64,221.5 ccw(c903.87,229.28) 914.87,229.28 cw(c925.87,229.28) 918.09,237.05 920.31,239.28 cw(c922.66,236.93) v2(922.66,240.25)